# Altium PCB Zotino.PCBDOC (part 8 of 10)
Units mm, origin at the board's own origin, x right, y up, seen from the top; angles counter-clockwise.
Board outline 160.1 x 100.1 mm, 4 copper layers (TopLayer, Internal Plane 2, Signal Layer 1, BottomLayer), stack 1.563 mm thick; 759 components, 378 nets, 2272 pads, 779 vias.
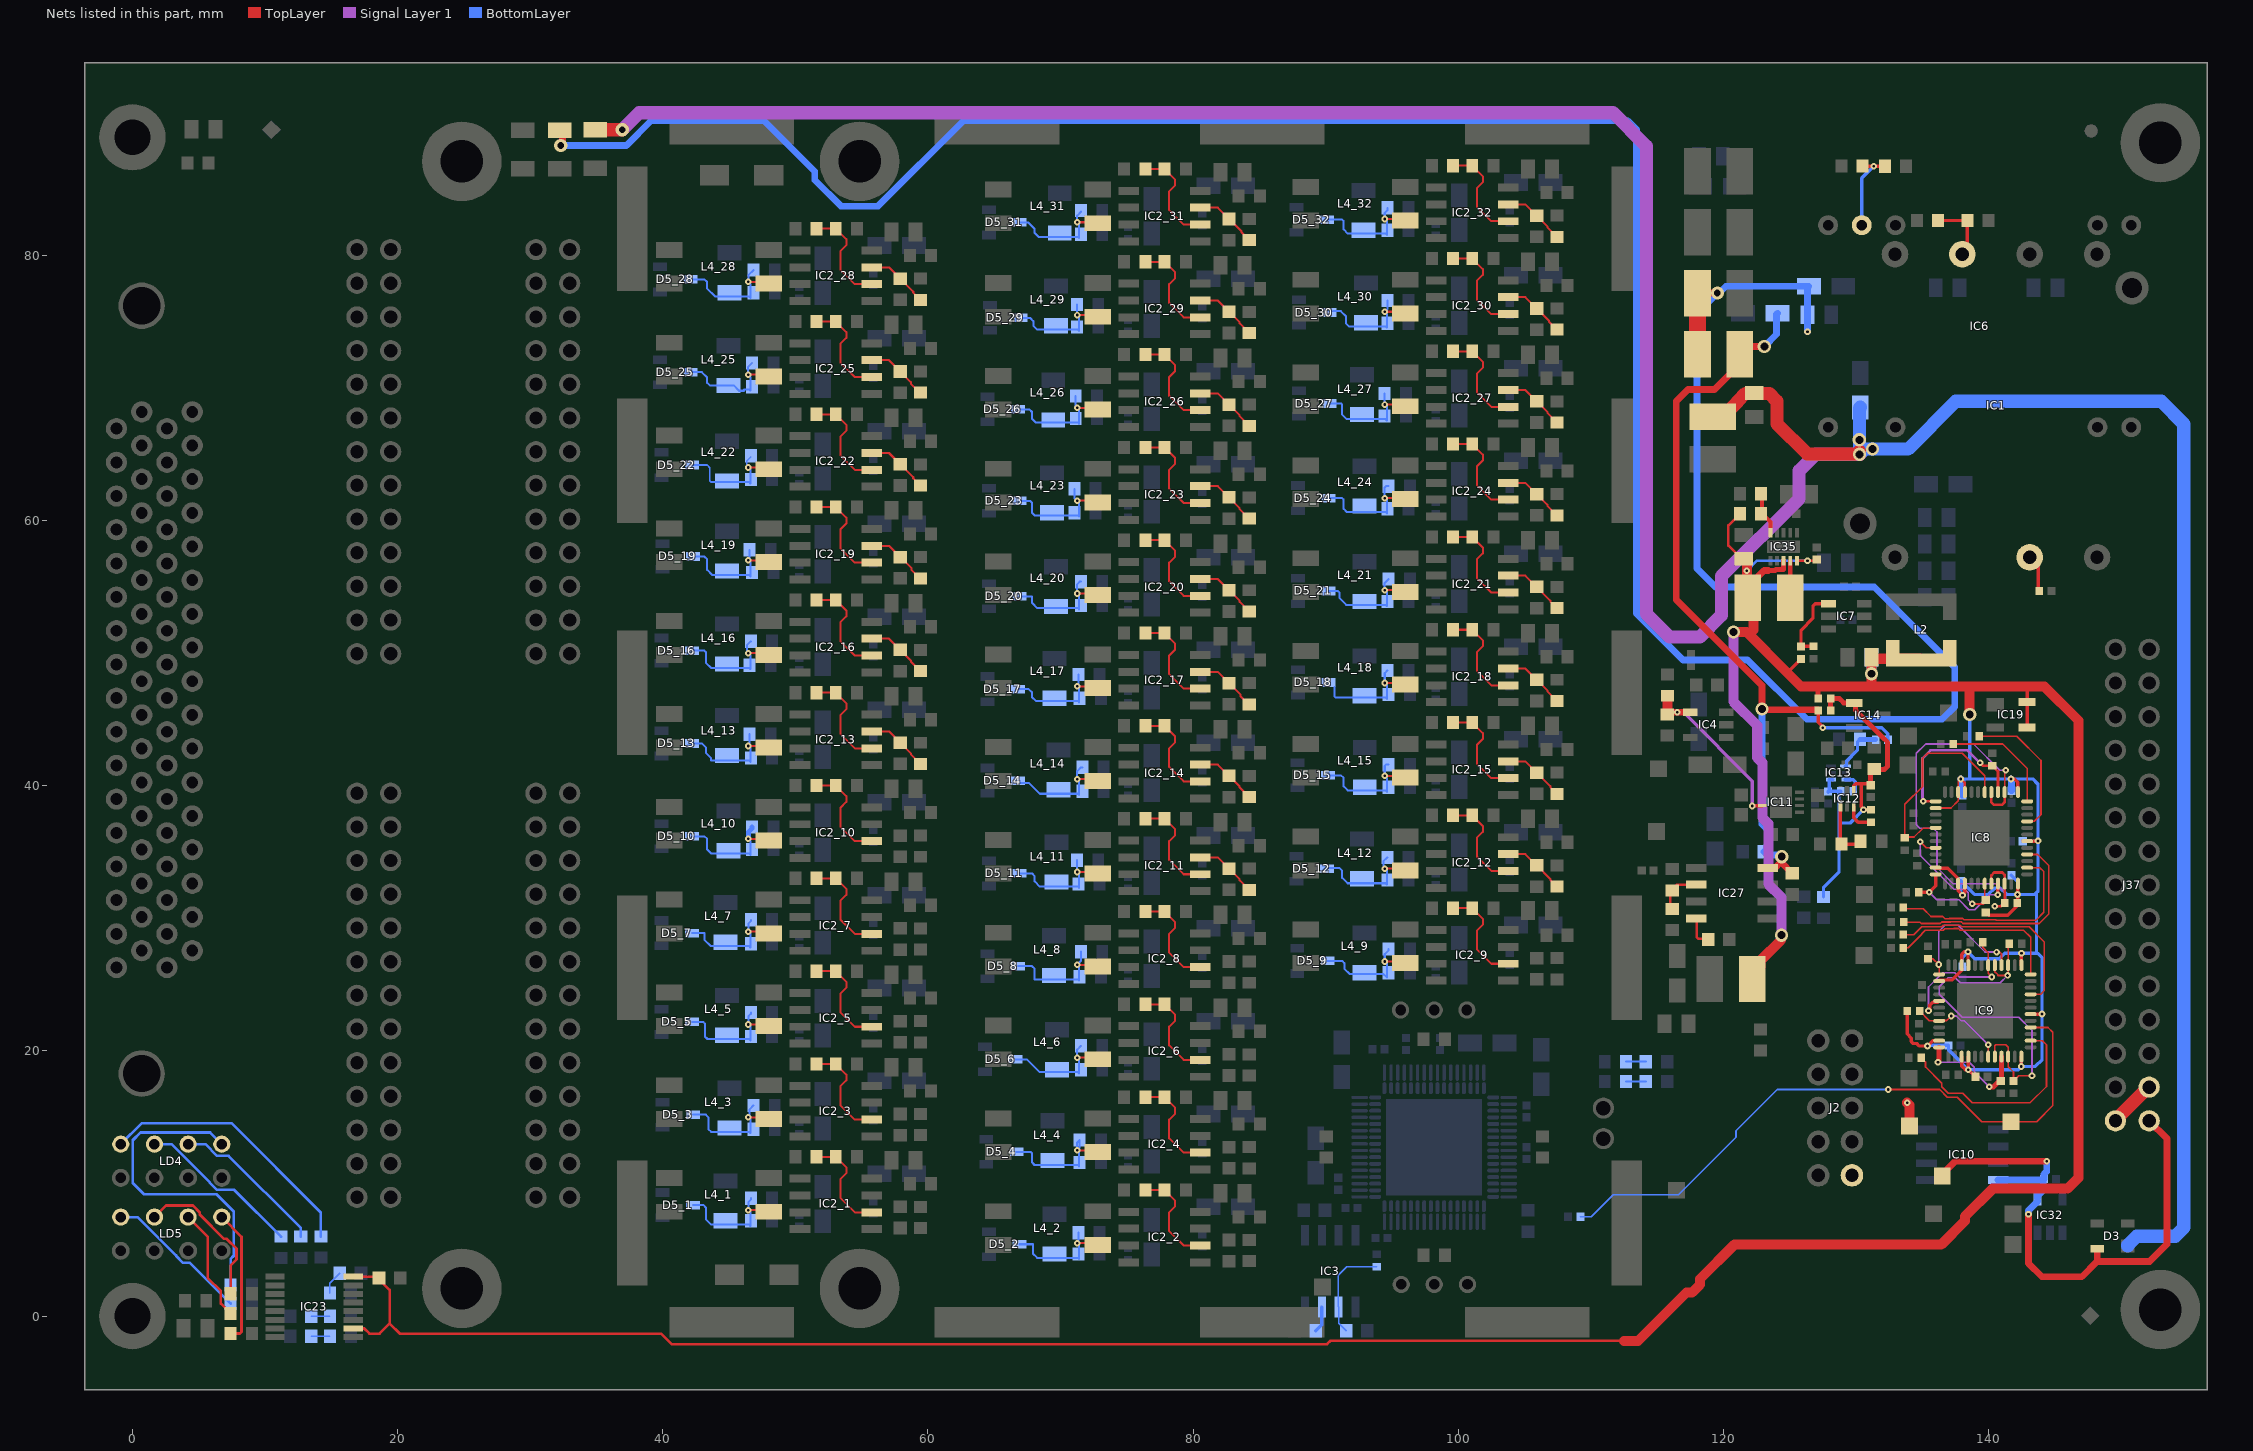
[diagram p8: the nets of this part, all layers, seen from the top]

## Via types
v1: diameter 0.5, hole 0.2, TopLayer to BottomLayer, tented both sides, 659 vias
v2: diameter 0.6, hole 0.3, TopLayer to BottomLayer, tented both sides, 56 vias
v3: diameter 1, hole 0.6, TopLayer to BottomLayer, tented both sides, 26 vias
v4: diameter 0.6, hole 0.3, TopLayer to BottomLayer, 18 vias
v5: diameter 1, hole 0.5, TopLayer to BottomLayer, tented both sides, 9 vias
v6: diameter 0.5, hole 0.2, TopLayer to BottomLayer, tented bottom, 7 vias
v7: diameter 0.5, hole 0.2, TopLayer to BottomLayer, 4 vias

## Nets (pads, with @x,y where several pads share a name; then routed paths per layer and width w, separated by ;. In a path a pad name is that pad's centre, name@x,y a point inside that pad or via, vN(x,y) a via of type N, cw(c..) or ccw(c..) an arc to the next point about the centre after c; other vN are vias at no path point) (continued)
NetC61_11_2: C61_11.2 IC2_11.3 R25_11.2 | length 4.7
  TopLayer w0.152: IC2_11.3@80.551,34.593 81.861,34.593 83.512,32.942 83.512,32.866 R25_11.2@84.236,32.142
NetC61_12_2: C61_12.2 IC2_12.3 R25_12.2 | length 4.7
  TopLayer w0.152: IC2_12.3@103.751,34.843 105.061,34.843 C61_12.2@105.912,33.992 106.94,32.964 106.94,32.888 R25_12.2@107.436,32.392
NetC61_13_2: C61_13.2 IC2_13.3 R25_13.2 | length 4.7
  TopLayer w0.152: IC2_13.3@55.751,44.093 57.061,44.093 C61_13.2@57.912,43.242 58.712,42.442 58.712,42.366 R25_13.2@59.436,41.642
NetC61_14_2: C61_14.2 IC2_14.3 R25_14.2 | length 4.7
  TopLayer w0.152: IC2_14.3@80.551,41.593 81.861,41.593 83.512,39.942 83.512,39.866 R25_14.2@84.236,39.142
NetC61_15_2: C61_15.2 IC2_15.3 R25_15.2 | length 4.7
  TopLayer w0.152: IC2_15.3@103.751,41.843 105.061,41.843 C61_15.2@105.912,40.992 106.94,39.964 106.94,39.888 R25_15.2@107.436,39.392
NetC61_16_2: C61_16.2 IC2_16.3 R25_16.2 | length 4.7
  TopLayer w0.152: IC2_16.3@55.751,51.093 57.061,51.093 C61_16.2@57.912,50.242 58.712,49.442 58.712,49.366 R25_16.2@59.436,48.642
NetC61_17_2: C61_17.2 IC2_17.3 R25_17.2 | length 4.8
  TopLayer w0.152: IC2_17.3@80.551,48.593 81.861,48.593 C61_17.2@82.712,47.742 83.566,46.888 83.566,46.766 84.19,46.142 R25_17.2@84.236,46.142
NetC61_18_2: C61_18.2 IC2_18.3 R25_18.2 | length 4.7
  TopLayer w0.152: IC2_18.3@103.751,48.843 105.061,48.843 106.712,47.192 106.712,47.116 R25_18.2@107.436,46.392
NetC61_19_2: C61_19.2 IC2_19.3 R25_19.2 | length 4.8
  TopLayer w0.152: IC2_19.3@55.751,58.093 57.061,58.093 58.766,56.388 58.766,56.266 59.39,55.642 R25_19.2@59.436,55.642
NetC61_20_2: C61_20.2 IC2_20.3 R25_20.2 | length 4.7
  TopLayer w0.152: IC2_20.3@80.551,55.593 81.861,55.593 83.512,53.942 83.512,53.866 R25_20.2@84.236,53.142
NetC61_21_2: C61_21.2 IC2_21.3 R25_21.2 | length 4.7
  TopLayer w0.152: IC2_21.3@103.751,55.843 105.061,55.843 106.94,53.964 106.94,53.888 R25_21.2@107.436,53.392
NetC61_22_2: C61_22.2 IC2_22.3 R25_22.2 | length 4.7
  TopLayer w0.152: IC2_22.3@55.751,65.093 57.061,65.093 C61_22.2@57.912,64.242 58.89,63.264 58.89,63.188 R25_22.2@59.436,62.642
NetC61_23_2: C61_23.2 IC2_23.3 R25_23.2 | length 4.7
  TopLayer w0.152: IC2_23.3@80.551,62.593 81.861,62.593 83.512,60.942 83.512,60.866 R25_23.2@84.236,60.142
NetC61_24_2: C61_24.2 IC2_24.3 R25_24.2 | length 4.8
  TopLayer w0.152: IC2_24.3@103.751,62.843 105.061,62.843 106.712,61.192 106.712,61.088 106.74,61.088 R25_24.2@107.436,60.392
NetC61_25_2: C61_25.2 IC2_25.3 R25_25.2 | length 4.8
  TopLayer w0.152: IC2_25.3@55.751,72.093 57.061,72.093 58.712,70.442 58.712,70.32 59.39,69.642 R25_25.2@59.436,69.642
NetC61_26_2: C61_26.2 IC2_26.3 R25_26.2 | length 4.7
  TopLayer w0.152: IC2_26.3@80.551,69.593 81.861,69.593 83.512,67.942 83.512,67.866 R25_26.2@84.236,67.142
NetC61_27_2: C61_27.2 IC2_27.3 R25_27.2 | length 4.7
  TopLayer w0.152: IC2_27.3@103.751,69.843 105.061,69.843 106.712,68.192 106.712,68.116 R25_27.2@107.436,67.392
NetC61_28_2: C61_28.2 IC2_28.3 R25_28.2 | length 4.7
  TopLayer w0.152: IC2_28.3@55.751,79.093 57.061,79.093 58.89,77.264 58.89,77.188 R25_28.2@59.436,76.642
NetC61_29_2: C61_29.2 IC2_29.3 R25_29.2 | length 4.7
  TopLayer w0.152: IC2_29.3@80.551,76.593 81.861,76.593 83.512,74.942 83.512,74.866 R25_29.2@84.236,74.142
NetC61_30_2: C61_30.2 IC2_30.3 R25_30.2 | length 4.7
  TopLayer w0.152: IC2_30.3@103.751,76.843 105.061,76.843 106.84,75.064 106.84,74.988 R25_30.2@107.436,74.392
NetC61_31_2: C61_31.2 IC2_31.3 R25_31.2 | length 4.7
  TopLayer w0.152: IC2_31.3@80.551,83.593 81.861,83.593 83.655,81.799 83.655,81.723 R25_31.2@84.236,81.142
NetC61_32_2: C61_32.2 IC2_32.3 R25_32.2 | length 4.8
  TopLayer w0.152: IC2_32.3@103.751,83.843 105.061,83.843 106.712,82.192 106.712,82.088 106.74,82.088 R25_32.2@107.436,81.392
NetC62_1_2: C62_1.2 D5_1.3 L4_1.1 R5_1.2 R7_1.2 | length 9.3
  TopLayer w0.152: v1(46.449,7.996) 47.863,7.996 L4_1.1@47.99,7.869
  BottomLayer w0.152: D5_1.3@42.294,8.369 42.308,8.383 43.049,8.383 43.244,8.188 43.244,7.305 43.655,6.894 46.507,6.894 46.607,6.794 46.607,7.839 v1(46.449,7.996) 46.449,8.594 46.644,8.788 R7_1.2@46.644,8.888
NetC62_2_2: C62_2.2 D5_2.3 L4_2.1 R5_2.2 R7_2.2 | length 9.1
  TopLayer w0.152: v1(71.249,5.496) 72.663,5.496 L4_2.1@72.79,5.369
  BottomLayer w0.152: D5_2.3@66.894,5.419 67.913,5.419 67.913,4.719 68.236,4.396 68.453,4.396 68.455,4.394 71.307,4.394 71.407,4.294 71.407,5.339 v1(71.249,5.496) 71.344,5.591 R7_2.2@71.344,6.288
NetC62_3_2: C62_3.2 D5_3.3 L4_3.1 R5_3.2 R7_3.2 | length 9.3
  TopLayer w0.152: v1(46.449,14.996) 47.863,14.996 L4_3.1@47.99,14.869
  BottomLayer w0.152: D5_3.3@42.294,15.188 43.244,15.188 43.444,14.988 43.444,14.105 43.655,13.894 46.507,13.894 46.607,13.794 46.607,14.839 v1(46.449,14.996) 46.544,15.091 46.544,15.588 R5_3.2@46.844,15.888
NetC62_4_2: C62_4.2 D5_4.3 L4_4.1 R5_4.2 R7_4.2 | length 10.2
  TopLayer w0.152: v1(71.249,12.496) 72.663,12.496 L4_4.1@72.79,12.369
  BottomLayer w0.152: D5_4.3@66.694,12.388 67.744,12.388 67.844,12.288 67.844,11.588 68.036,11.396 68.453,11.396 68.455,11.394 71.307,11.394 71.407,11.294 71.407,12.339 v1(71.249,12.496) ; v1(71.249,12.496) 71.249,13.094 R5_4.2@71.444,13.288 71.444,12.691 v1(71.249,12.496)
NetC62_5_2: C62_5.2 D5_5.3 L4_5.1 R5_5.2 R7_5.2 | length 9.4
  TopLayer w0.152: v1(46.449,21.996) 47.863,21.996 L4_5.1@47.99,21.869
  BottomLayer w0.152: D5_5.3@42.194,22.188 43.044,22.188 43.18,22.052 43.18,21.088 43.372,20.896 43.842,20.896 43.844,20.894 46.507,20.894 46.607,20.794 46.607,21.839 v1(46.449,21.996) 46.449,22.594 46.644,22.788 R5_5.2@46.644,22.888
NetC62_6_2: C62_6.2 D5_6.3 L4_6.1 R5_6.2 R7_6.2 | length 9.1
  TopLayer w0.152: v1(71.249,19.496) 72.663,19.496 L4_6.1@72.79,19.369
  BottomLayer w0.152: D5_6.3@66.61,19.369 67.463,19.369 68.438,18.394 71.307,18.394 71.407,18.294 71.407,19.339 v1(71.249,19.496) 71.244,19.501 71.244,20.088 R5_6.2@71.544,20.388
NetC62_7_2: C62_7.2 D5_7.3 L4_7.1 R5_7.2 R7_7.2 | length 9
  TopLayer w0.152: v1(46.449,28.996) 47.863,28.996 L4_7.1@47.99,28.869
  BottomLayer w0.152: D5_7.3@42.194,28.888 43.144,28.888 43.144,28.388 43.636,27.896 43.653,27.896 43.655,27.894 46.507,27.894 46.607,27.794 46.607,28.839 v1(46.449,28.996) 46.449,29.594 46.644,29.788 R5_7.2@46.644,29.888
NetC62_8_2: C62_8.2 D5_8.3 L4_8.1 R5_8.2 R7_8.2 | length 9.5
  TopLayer w0.152: v1(71.249,26.496) 72.663,26.496 L4_8.1@72.79,26.369
  BottomLayer w0.152: D5_8.3@66.799,26.388 67.844,26.388 68.044,26.188 68.044,25.396 68.453,25.396 68.455,25.394 71.307,25.394 71.407,25.294 71.407,26.339 v1(71.249,26.496) 71.544,26.791 R5_8.2@71.544,27.488
NetC62_9_2: C62_9.2 D5_9.3 L4_9.1 R5_9.2 R7_9.2 | length 9.2
  TopLayer w0.152: v1(94.449,26.746) 95.863,26.746 L4_9.1@95.99,26.619
  BottomLayer w0.152: D5_9.3@90.149,26.788 91.244,26.788 91.411,26.622 91.411,26.188 91.796,25.802 94.349,25.802 94.607,25.544 94.607,26.589 v1(94.449,26.746) 94.449,27.294 94.744,27.588 R5_9.2@94.744,27.69
NetC62_10_2: C62_10.2 D5_10.3 L4_10.1 R5_10.2 R7_10.2 | length 9.3
  TopLayer w0.152: v1(46.449,35.996) 47.863,35.996 L4_10.1@47.99,35.869
  BottomLayer w0.152: D5_10.3@42.194,36.188 43.144,36.188 43.344,35.988 43.344,35.188 43.636,34.896 43.653,34.896 43.655,34.894 46.507,34.894 46.607,34.794 46.607,35.839 v1(46.449,35.996)
  BottomLayer w0.381: v1(46.449,35.996) 46.449,36.494 46.744,36.788 R5_10.2@46.744,36.888
NetC62_11_2: C62_11.2 D5_11.3 L4_11.1 R5_11.2 R7_11.2 | length 9
  TopLayer w0.152: v1(71.249,33.496) 72.663,33.496 L4_11.1@72.79,33.369
  BottomLayer w0.152: D5_11.3@66.894,33.388 67.844,33.388 68.044,33.188 68.044,32.788 68.436,32.396 68.453,32.396 68.455,32.394 71.307,32.394 71.407,32.294 71.407,33.339 v1(71.249,33.496) 71.244,33.501 R5_11.2@71.244,34.388
NetC62_12_2: C62_12.2 D5_12.3 L4_12.1 R5_12.2 R7_12.2 | length 9.2
  TopLayer w0.152: v1(94.449,33.746) 95.863,33.746 L4_12.1@95.99,33.619
  BottomLayer w0.152: D5_12.3@90.149,33.788 91.044,33.788 91.244,33.588 91.244,33.055 91.655,32.644 94.507,32.644 94.607,32.544 94.607,33.589 v1(94.449,33.746) 94.344,33.851 94.344,34.288 R5_12.2@94.644,34.588
NetC62_13_2: C62_13.2 D5_13.3 L4_13.1 R5_13.2 R7_13.2 | length 9.1
  TopLayer w0.152: v1(46.449,42.996) 47.863,42.996 L4_13.1@47.99,42.869
  BottomLayer w0.152: D5_13.3@42.194,43.188 42.949,43.188 43.244,42.893 43.244,42.488 43.653,42.079 43.653,41.896 43.655,41.894 46.507,41.894 46.607,41.794 46.607,42.839 v1(46.449,42.996) 46.544,43.091 R5_13.2@46.544,43.888
NetC62_14_2: C62_14.2 D5_14.3 L4_14.1 R5_14.2 R7_14.2 | length 9
  TopLayer w0.152: v1(71.249,40.496) 72.663,40.496 L4_14.1@72.79,40.369
  BottomLayer w0.152: D5_14.3@66.799,40.388 66.993,40.194 67.638,40.194 68.438,39.394 71.307,39.394 71.407,39.294 71.407,40.339 v1(71.249,40.496) 71.249,41.094 71.544,41.388 R5_14.2@71.644,41.388
NetC62_15_2: C62_15.2 D5_15.3 L4_15.1 R5_15.2 R7_15.2 | length 9.3
  TopLayer w0.152: v1(94.449,40.746) 95.863,40.746 L4_15.1@95.99,40.619
  BottomLayer w0.152: D5_15.3@90.175,40.788 91.144,40.788 91.344,40.588 91.344,39.955 91.655,39.644 94.507,39.644 94.607,39.544 94.607,40.589 v1(94.449,40.746) 94.449,41.494 94.544,41.588 R5_15.2@94.744,41.588
NetC62_16_2: C62_16.2 D5_16.3 L4_16.1 R5_16.2 R7_16.2 | length 9.4
  TopLayer w0.152: v1(46.449,49.996) 47.863,49.996 L4_16.1@47.99,49.869
  BottomLayer w0.152: D5_16.3@42.194,50.188 43.144,50.188 43.244,50.088 43.244,49.288 43.636,48.896 43.742,48.896 43.744,48.894 46.507,48.894 46.607,48.794 46.607,49.839 v1(46.449,49.996) 46.344,50.101 46.344,50.588 R5_16.2@46.644,50.888
NetC62_17_2: C62_17.2 D5_17.3 L4_17.1 R5_17.2 R7_17.2 | length 9
  TopLayer w0.152: v1(71.249,47.496) 72.663,47.496 L4_17.1@72.79,47.369
  BottomLayer w0.152: D5_17.3@66.794,47.288 67.594,47.288 67.844,47.038 67.844,46.688 68.136,46.396 68.453,46.396 68.455,46.394 71.307,46.394 71.407,46.294 71.407,47.339 v1(71.249,47.496) 71.344,47.591 R5_17.2@71.344,48.388
NetC62_18_2: C62_18.2 D5_18.3 L4_18.1 R5_18.2 R7_18.2 | length 8.6
  TopLayer w0.152: v1(94.449,47.746) 95.863,47.746 L4_18.1@95.99,47.619
  BottomLayer w0.152: 90.657,47.444 90.657,46.738 90.749,46.646 91.653,46.646 91.655,46.644 94.507,46.644 94.607,46.544 94.607,47.589 v1(94.449,47.746) 94.449,48.494 R7_18.2@94.644,48.688
NetC62_19_2: C62_19.2 D5_19.3 L4_19.1 R5_19.2 R7_19.2 | length 9.1
  TopLayer w0.152: v1(46.449,56.996) 47.863,56.996 L4_19.1@47.99,56.869
  BottomLayer w0.152: D5_19.3@42.294,57.288 43.144,57.288 43.35,57.082 43.35,56.288 43.744,55.894 46.507,55.894 46.607,55.794 46.607,56.839 v1(46.449,56.996) 46.544,57.091 R7_19.2@46.544,57.788
NetC62_20_2: C62_20.2 D5_20.3 L4_20.1 R5_20.2 R7_20.2 | length 9.1
  TopLayer w0.152: v1(71.249,54.496) 72.663,54.496 L4_20.1@72.79,54.369
  BottomLayer w0.152: D5_20.3@66.894,54.288 67.844,54.288 67.844,53.788 68.236,53.396 68.453,53.396 68.455,53.394 71.307,53.394 71.407,53.294 71.407,54.339 v1(71.249,54.496) 71.249,55.194 71.444,55.388 R5_20.2@71.544,55.388
NetC62_21_2: C62_21.2 D5_21.3 L4_21.1 R5_21.2 R7_21.2 | length 8.9
  TopLayer w0.152: v1(94.449,54.746) 95.863,54.746 L4_21.1@95.99,54.619
  BottomLayer w0.152: D5_21.3@90.194,54.688 90.894,54.688 91.044,54.538 91.044,54.146 91.544,53.646 91.653,53.646 91.655,53.644 94.507,53.644 94.607,53.544 94.607,54.589 v1(94.449,54.746) 94.444,54.751 94.444,55.288 R5_21.2@94.744,55.588
NetC62_22_2: C62_22.2 D5_22.3 L4_22.1 R5_22.2 R7_22.2 | length 9.4
  TopLayer w0.152: v1(46.449,63.996) 47.863,63.996 L4_22.1@47.99,63.869
  BottomLayer w0.127: D5_22.3@42.194,64.188 43.344,64.188 43.544,63.988 43.544,63.005 43.653,62.896 ; v1(46.449,63.996) 46.344,64.101 46.344,64.488 R5_22.2@46.644,64.788
  BottomLayer w0.152: 43.653,62.896 43.655,62.894 46.507,62.894 46.607,62.794 46.607,63.839 v1(46.449,63.996)
NetC62_23_2: C62_23.2 D5_23.3 L4_23.1 R5_23.2 R7_23.2 | length 9.3
  TopLayer w0.152: v1(71.249,61.496) 72.663,61.496 L4_23.1@72.79,61.369
  BottomLayer w0.152: D5_23.3@66.894,61.488 67.694,61.488 67.844,61.338 67.844,60.588 68.036,60.396 68.453,60.396 68.455,60.394 71.307,60.394 71.407,60.294 71.407,61.339 v1(71.249,61.496) 71.044,61.701 R5_23.2@71.044,62.388
NetC62_24_2: C62_24.2 D5_24.3 L4_24.1 R5_24.2 R7_24.2 | length 9.3
  TopLayer w0.152: v1(94.444,61.688) 95.805,61.688 95.863,61.746 L4_24.1@95.99,61.619
  BottomLayer w0.152: D5_24.3@90.194,61.688 91.244,61.688 91.344,61.588 91.344,60.888 91.588,60.644 94.507,60.644 94.607,60.544 94.607,61.589 94.507,61.688 v1(94.444,61.688) 94.444,62.488 94.544,62.588 R5_24.2@94.744,62.588
NetC62_25_2: C62_25.2 D5_25.3 L4_25.1 R5_25.2 R7_25.2 | length 9.2
  TopLayer w0.152: v1(46.449,70.996) 47.863,70.996 L4_25.1@47.99,70.869
  BottomLayer w0.152: D5_25.3@42.094,71.188 42.944,71.188 43.344,70.788 43.344,70.388 43.544,70.188 C62_25.2@44.944,70.188 45.35,70.188 45.75,69.788 46.144,69.788 ; 46.144,69.894 46.507,69.894 46.607,69.794 46.607,70.839 v1(46.449,70.996) 46.444,71.001 46.444,71.588 R5_25.2@46.744,71.888
NetC62_26_2: C62_26.2 D5_26.3 L4_26.1 R5_26.2 R7_26.2 | length 9.2
  TopLayer w0.152: v1(71.249,68.496) 72.663,68.496 L4_26.1@72.79,68.369
  BottomLayer w0.152: D5_26.3@66.794,68.388 67.644,68.388 67.844,68.188 67.844,67.688 68.136,67.396 68.453,67.396 68.455,67.394 71.307,67.394 71.407,67.294 71.407,68.339 v1(71.249,68.496) 71.144,68.601 R5_26.2@71.144,69.388
NetC62_27_2: C62_27.2 D5_27.3 L4_27.1 R5_27.2 R7_27.2 | length 9
  TopLayer w0.152: v1(94.449,68.746) 95.863,68.746 L4_27.1@95.99,68.619
  BottomLayer w0.152: D5_27.3@90.294,68.824 91.158,68.824 91.244,68.738 91.244,67.988 91.586,67.646 91.653,67.646 91.655,67.644 94.507,67.644 94.607,67.544 94.607,68.589 v1(94.449,68.746) 94.444,68.751 R5_27.2@94.444,69.588
NetC62_28_2: C62_28.2 D5_28.3 L4_28.1 R5_28.2 R7_28.2 | length 9.3
  TopLayer w0.152: v1(46.449,77.996) 47.863,77.996 L4_28.1@47.99,77.869
  BottomLayer w0.152: D5_28.3@42.094,78.188 43.144,78.188 43.344,77.988 43.344,77.494 43.944,76.894 46.507,76.894 46.607,76.794 46.607,77.839 v1(46.449,77.996) 46.449,78.494 R5_28.2@46.844,78.888
NetC62_29_2: C62_29.2 D5_29.3 L4_29.1 R5_29.2 R7_29.2 | length 8.7
  TopLayer w0.152: v1(71.249,75.496) 72.663,75.496 L4_29.1@72.79,75.369
  BottomLayer w0.152: D5_29.3@66.994,75.288 67.694,75.288 67.944,75.038 67.944,74.688 68.236,74.396 68.453,74.396 68.455,74.394 71.307,74.394 71.407,74.294 71.407,75.339 v1(71.249,75.496) 71.244,75.501 R5_29.2@71.244,76.288
NetC62_30_2: C62_30.2 D5_30.3 L4_30.1 R5_30.2 R7_30.2 | length 8.9
  TopLayer w0.152: v1(94.449,75.746) 95.863,75.746 L4_30.1@95.99,75.619
  BottomLayer w0.152: D5_30.3@90.294,75.788 91.144,75.788 91.544,75.388 91.544,74.844 91.744,74.644 94.507,74.644 94.607,74.544 94.607,75.589 v1(94.449,75.746) 94.644,75.941 R5_30.2@94.644,76.588
NetC62_31_2: C62_31.2 D5_31.3 L4_31.1 R5_31.2 R7_31.2 | length 9
  TopLayer w0.152: v1(71.249,82.496) 72.663,82.496 L4_31.1@72.79,82.369
  BottomLayer w0.152: D5_31.3@66.899,82.488 67.544,82.488 68.044,81.988 68.044,81.688 68.336,81.396 68.453,81.396 68.455,81.394 71.307,81.394 71.407,81.294 71.407,82.339 v1(71.249,82.496) 71.249,82.994 R5_31.2@71.544,83.288
NetC62_32_2: C62_32.2 D5_32.3 L4_32.1 R5_32.2 R7_32.2 | length 9.1
  TopLayer w0.152: v1(94.449,82.746) 95.863,82.746 L4_32.1@95.99,82.619
  BottomLayer w0.152: D5_32.3@90.094,82.688 91.244,82.688 91.344,82.588 91.344,81.955 91.655,81.644 94.507,81.644 94.607,81.544 94.607,82.589 v1(94.449,82.746) 94.449,83.194 94.644,83.388 R5_32.2@94.644,83.588
NetC63_2: C63.2 C133.2 C134.1 IC27.8 L7.2 R36.2 R38.2 | length 64.7
  TopLayer w0.254: R36.2@127.138,45.676 127.138,44.789 127.478,44.449 v1(127.478,44.382)
  TopLayer w0.508: v3(123.08,73.134) 121.237,73.134 121.237,71.8 120.491,71.054 120.484,71.054 119.318,69.888 117.325,69.888 116.43,68.993 116.43,54.048 122.907,47.571 v3(122.907,45.793) 122.968,45.732 127.102,45.732 127.138,45.696 R36.2@127.138,45.676 ; IC27.8@123.34,33.81 123.889,33.81 v3@124.278,34.199 ; v3(124.39,34.653) 124.296,34.559 124.296,34.217 v3@124.278,34.199 ; C133.2@125.178,33.399 124.378,34.199 v3@124.278,34.199
  BottomLayer w0.254: v1(127.478,44.382) 127.487,44.374 131.939,44.374 132.393,43.919 132.393,43.491 R38.2@132.409,43.475
  BottomLayer w0.508: v3(122.907,45.793) 122.907,38.761 122.911,38.757 122.911,38.235 122.907,38.231 122.907,37.104 123.369,36.642 123.369,35.562 123.273,35.466 123.273,35.239 C63.2@123.052,35.018 123.273,34.797 123.273,34.772 124.138,34.772 124.257,34.653 v3(124.39,34.653) ; v3(123.08,73.134) 123.994,74.048 123.994,75.553 C134.1@124.08,75.638
NetC64_1: C64.1 IC27.4 | length 2.3
  TopLayer w0.2: IC27.4@117.94,30 117.973,29.968 117.973,28.588 118.09,28.471 C64.1@118.776,28.471
NetC68_2: C68.2 R117.1 | length 1.5
  BottomLayer w0.152: R117.1@112.644,19.191 C68.2@114.144,19.191
NetC71_2: C71.2 R118.1 | length 1.4
  BottomLayer w0.127: C71.2@13.494,-0.012 R118.1@14.894,-0.012
NetC76_2: C76.2 R82.1 | length 1.4
  BottomLayer w0.127: C76.2@13.494,-1.512 R82.1@14.894,-1.512
NetC77_2: C77.2 R58.1 | length 1.8
  BottomLayer w0.127: R58.1@14.894,1.738 14.894,2.488 C77.2@15.644,3.238
NetC80_2: C80.2 IC3.2 R3.2 | length 7.6
  BottomLayer w0.127: C80.2@91.544,-1.112 90.979,-0.547 IC3.2@90.979,0.688 90.944,0.723 90.944,3.088 91.574,3.718 R3.2@93.844,3.718
NetC82_2: C82.2 IC3.3 | length 2
  BottomLayer w0.254: C82.2@89.244,-1.112 89.69,-0.666 89.69,0.669 IC3.3@89.709,0.688
NetC95_2: C95.2 R116.1 | length 1.5
  BottomLayer w0.152: R116.1@112.644,17.688 C95.2@114.144,17.688
NetC131_2: C131.2 C132.1 L6.2 L7.1 R31.1 | length 216.4
  TopLayer w0.508: v5(32.311,88.284) 32.311,88.549 32.444,88.682 R31.1@32.444,89.438 ; L6.2@118.037,77.147 118.055,77.165 v5(119.537,77.165)
  TopLayer w1.27: L7.1@118.037,73.134 L6.2@118.037,77.147
  BottomLayer w0.508: v5(32.311,88.284) 37.25,88.284 39.116,90.15 47.647,90.15 51.463,86.334 51.463,85.688 53.444,83.707 56.244,83.707 62.688,90.15 112.782,90.15 113.444,89.488 113.444,52.988 116.944,49.488 121.815,49.488 126.29,45.013 136.484,45.013 137.444,45.973 137.444,48.915 131.367,54.992 119.401,54.992 118.004,56.389 118.004,75.632 v5(119.537,77.165) ; v5@119.46,77.165 119.67,77.165 120.176,77.67 C132.1@126.433,77.67 126.325,77.562 C131.2@126.325,75.511 126.324,74.252 v1(126.336,74.241)
NetIC1_2: IC1.2 R2.2 | length 2.8
  TopLayer w0.254: IC1.2@143.092,57.226 143.726,56.592 R2.2@143.726,54.686
NetIC1_6: IC1.6 R1.1 R4.2 | length 4.9
  TopLayer w0.254: R1.1@136.182,82.626 R4.2@138.392,82.626 138.392,80.466 IC1.6@138.012,80.086
NetIC2_1_2: IC2_1.2 R67_1.1 R68_1.2 | length 7.9
  TopLayer w0.152: R67_1.1@51.6,12.014 R68_1.2@53.048,12.014 53.848,11.214 53.848,10.776 53.395,10.323 53.395,8.911 54.483,7.823 IC2_1.2@55.751,7.823
NetIC2_2_2: IC2_2.2 R67_2.1 R68_2.2 | length 7.9
  TopLayer w0.152: R67_2.1@76.4,9.514 R68_2.2@77.848,9.514 78.648,8.714 78.648,8.276 78.195,7.823 78.195,6.411 79.283,5.323 IC2_2.2@80.551,5.323
NetIC2_3_2: IC2_3.2 R67_3.1 R68_3.2 | length 7.9
  TopLayer w0.152: R67_3.1@51.6,19.014 R68_3.2@53.048,19.014 53.848,18.214 53.848,17.776 53.395,17.323 53.395,15.911 54.483,14.823 IC2_3.2@55.751,14.823
NetIC2_4_2: IC2_4.2 R67_4.1 R68_4.2 | length 7.9
  TopLayer w0.152: R67_4.1@76.4,16.514 R68_4.2@77.848,16.514 78.648,15.714 78.648,15.276 78.195,14.823 78.195,13.411 79.283,12.323 IC2_4.2@80.551,12.323
NetIC2_5_2: IC2_5.2 R67_5.1 R68_5.2 | length 7.9
  TopLayer w0.152: R67_5.1@51.6,26.014 R68_5.2@53.048,26.014 53.848,25.214 53.848,24.776 53.395,24.323 53.395,22.911 54.483,21.823 IC2_5.2@55.751,21.823
NetIC2_6_2: IC2_6.2 R67_6.1 R68_6.2 | length 7.9
  TopLayer w0.152: R67_6.1@76.4,23.514 R68_6.2@77.848,23.514 78.648,22.714 78.648,22.276 78.195,21.823 78.195,20.411 79.283,19.323 IC2_6.2@80.551,19.323
NetIC2_7_2: IC2_7.2 R67_7.1 R68_7.2 | length 7.9
  TopLayer w0.152: R67_7.1@51.6,33.014 R68_7.2@53.048,33.014 53.848,32.214 53.848,31.776 53.395,31.323 53.395,29.911 54.483,28.823 IC2_7.2@55.751,28.823
NetIC2_8_2: IC2_8.2 R67_8.1 R68_8.2 | length 7.9
  TopLayer w0.152: R67_8.1@76.4,30.514 R68_8.2@77.848,30.514 78.648,29.714 78.648,29.276 78.195,28.823 78.195,27.411 79.283,26.323 IC2_8.2@80.551,26.323
NetIC2_9_2: IC2_9.2 R67_9.1 R68_9.2 | length 7.9
  TopLayer w0.152: R67_9.1@99.6,30.764 R68_9.2@101.048,30.764 101.848,29.964 101.848,29.526 101.395,29.073 101.395,27.661 102.483,26.573 IC2_9.2@103.751,26.573
NetIC2_10_2: IC2_10.2 R67_10.1 R68_10.2 | length 7.9
  TopLayer w0.152: R67_10.1@51.6,40.014 R68_10.2@53.048,40.014 53.848,39.214 53.848,38.776 53.395,38.323 53.395,36.911 54.483,35.823 IC2_10.2@55.751,35.823
NetIC2_11_2: IC2_11.2 R67_11.1 R68_11.2 | length 7.9
  TopLayer w0.152: R67_11.1@76.4,37.514 R68_11.2@77.848,37.514 78.648,36.714 78.648,36.276 78.195,35.823 78.195,34.411 79.283,33.323 IC2_11.2@80.551,33.323
NetIC2_12_2: IC2_12.2 R67_12.1 R68_12.2 | length 7.9
  TopLayer w0.152: R67_12.1@99.6,37.764 R68_12.2@101.048,37.764 101.848,36.964 101.848,36.526 101.395,36.073 101.395,34.661 102.483,33.573 IC2_12.2@103.751,33.573
NetIC2_13_2: IC2_13.2 R67_13.1 R68_13.2 | length 7.9
  TopLayer w0.152: R67_13.1@51.6,47.014 R68_13.2@53.048,47.014 53.848,46.214 53.848,45.776 53.395,45.323 53.395,43.911 54.483,42.823 IC2_13.2@55.751,42.823
NetIC2_14_2: IC2_14.2 R67_14.1 R68_14.2 | length 7.9
  TopLayer w0.152: R67_14.1@76.4,44.514 R68_14.2@77.848,44.514 78.648,43.714 78.648,43.276 78.195,42.823 78.195,41.411 79.283,40.323 IC2_14.2@80.551,40.323
NetIC2_15_2: IC2_15.2 R67_15.1 R68_15.2 | length 7.9
  TopLayer w0.152: R67_15.1@99.6,44.764 R68_15.2@101.048,44.764 101.848,43.964 101.848,43.526 101.395,43.073 101.395,41.661 102.483,40.573 IC2_15.2@103.751,40.573
NetIC2_16_2: IC2_16.2 R67_16.1 R68_16.2 | length 7.9
  TopLayer w0.152: R67_16.1@51.6,54.014 R68_16.2@53.048,54.014 53.848,53.214 53.848,52.776 53.395,52.323 53.395,50.911 54.483,49.823 IC2_16.2@55.751,49.823
NetIC2_17_2: IC2_17.2 R67_17.1 R68_17.2 | length 7.9
  TopLayer w0.152: R67_17.1@76.4,51.514 R68_17.2@77.848,51.514 78.648,50.714 78.648,50.276 78.195,49.823 78.195,48.411 79.283,47.323 IC2_17.2@80.551,47.323
NetIC2_18_2: IC2_18.2 R67_18.1 R68_18.2 | length 7.9
  TopLayer w0.152: R67_18.1@99.6,51.764 R68_18.2@101.048,51.764 101.848,50.964 101.848,50.526 101.395,50.073 101.395,48.661 102.483,47.573 IC2_18.2@103.751,47.573
NetIC2_19_2: IC2_19.2 R67_19.1 R68_19.2 | length 7.9
  TopLayer w0.152: R67_19.1@51.6,61.014 R68_19.2@53.048,61.014 53.848,60.214 53.848,59.776 53.395,59.323 53.395,57.911 54.483,56.823 IC2_19.2@55.751,56.823
NetIC2_20_2: IC2_20.2 R67_20.1 R68_20.2 | length 7.9
  TopLayer w0.152: R67_20.1@76.4,58.514 R68_20.2@77.848,58.514 78.648,57.714 78.648,57.276 78.195,56.823 78.195,55.411 79.283,54.323 IC2_20.2@80.551,54.323
NetIC2_21_2: IC2_21.2 R67_21.1 R68_21.2 | length 7.9
  TopLayer w0.152: R67_21.1@99.6,58.764 R68_21.2@101.048,58.764 101.848,57.964 101.848,57.526 101.395,57.073 101.395,55.661 102.483,54.573 IC2_21.2@103.751,54.573
NetIC2_22_2: IC2_22.2 R67_22.1 R68_22.2 | length 7.9
  TopLayer w0.152: R67_22.1@51.6,68.014 R68_22.2@53.048,68.014 53.848,67.214 53.848,66.776 53.395,66.323 53.395,64.911 54.483,63.823 IC2_22.2@55.751,63.823
NetIC2_23_2: IC2_23.2 R67_23.1 R68_23.2 | length 7.9
  TopLayer w0.152: R67_23.1@76.4,65.514 R68_23.2@77.848,65.514 78.648,64.714 78.648,64.276 78.195,63.823 78.195,62.411 79.283,61.323 IC2_23.2@80.551,61.323
NetIC2_24_2: IC2_24.2 R67_24.1 R68_24.2 | length 7.9
  TopLayer w0.152: R67_24.1@99.6,65.764 R68_24.2@101.048,65.764 101.848,64.964 101.848,64.526 101.395,64.073 101.395,62.661 102.483,61.573 IC2_24.2@103.751,61.573
NetIC2_25_2: IC2_25.2 R67_25.1 R68_25.2 | length 7.9
  TopLayer w0.152: R67_25.1@51.6,75.014 R68_25.2@53.048,75.014 53.848,74.214 53.848,73.776 53.395,73.323 53.395,71.911 54.483,70.823 IC2_25.2@55.751,70.823
NetIC2_26_2: IC2_26.2 R67_26.1 R68_26.2 | length 7.9
  TopLayer w0.152: R67_26.1@76.4,72.514 R68_26.2@77.848,72.514 78.648,71.714 78.648,71.276 78.195,70.823 78.195,69.411 79.283,68.323 IC2_26.2@80.551,68.323
NetIC2_27_2: IC2_27.2 R67_27.1 R68_27.2 | length 7.9
  TopLayer w0.152: R67_27.1@99.6,72.764 R68_27.2@101.048,72.764 101.848,71.964 101.848,71.526 101.395,71.073 101.395,69.661 102.483,68.573 IC2_27.2@103.751,68.573
NetIC2_28_2: IC2_28.2 R67_28.1 R68_28.2 | length 7.9
  TopLayer w0.152: R67_28.1@51.6,82.014 R68_28.2@53.048,82.014 53.848,81.214 53.848,80.776 53.395,80.323 53.395,78.911 54.483,77.823 IC2_28.2@55.751,77.823
NetIC2_29_2: IC2_29.2 R67_29.1 R68_29.2 | length 7.9
  TopLayer w0.152: R67_29.1@76.4,79.514 R68_29.2@77.848,79.514 78.648,78.714 78.648,78.276 78.195,77.823 78.195,76.411 79.283,75.323 IC2_29.2@80.551,75.323
NetIC2_30_2: IC2_30.2 R67_30.1 R68_30.2 | length 7.9
  TopLayer w0.152: R67_30.1@99.6,79.764 R68_30.2@101.048,79.764 101.848,78.964 101.848,78.526 101.395,78.073 101.395,76.661 102.483,75.573 IC2_30.2@103.751,75.573
NetIC2_31_2: IC2_31.2 R67_31.1 R68_31.2 | length 7.9
  TopLayer w0.152: R67_31.1@76.4,86.514 R68_31.2@77.848,86.514 78.648,85.714 78.648,85.276 78.195,84.823 78.195,83.411 79.283,82.323 IC2_31.2@80.551,82.323
NetIC2_32_2: IC2_32.2 R67_32.1 R68_32.2 | length 7.9
  TopLayer w0.152: R67_32.1@99.6,86.764 R68_32.2@101.048,86.764 101.848,85.964 101.848,85.526 101.395,85.073 101.395,83.661 102.483,82.573 IC2_32.2@103.751,82.573
NetIC4_4: IC4.4 IC11.3 R69.1 R70.2 | length 13.1
  TopLayer w0.254: v1(122.169,38.47) 122.202,38.503 122.932,38.503 IC11.3@122.934,38.505
  TopLayer w0.508: R69.1@116.176,45.539 v1(116.504,45.539) IC4.4@117.446,45.539
  TopLayer w0.762: R69.1@115.766,45.396 R70.2@115.766,46.788
  Signal Layer 1 w0.254: v1(116.504,45.539) 116.551,45.492 117.032,45.492 122.173,40.351 122.173,38.474 v1(122.169,38.47)
NetIC6_10: IC6.10 R26.1 R27.2 | length 6.5
  TopLayer w0.254: R27.2@130.487,86.732 v1(131.325,86.732) 132.164,86.732 R26.1@132.176,86.719
  BottomLayer w0.254: IC6.10@130.427,82.277 130.427,85.834 v1(131.325,86.732)
NetIC7_4: IC7.4 R33.1 R34.2 | length 5.6
  TopLayer w0.254: R34.2@126.794,50.511 126.789,50.505 125.85,50.505 R33.1@125.844,50.5 125.844,51.738 126.744,52.638 126.744,53.549 126.918,53.723 IC7.4@127.92,53.723
NetIC8_1: IC8.1 IC8.40 R16.2 | length 12.4
  TopLayer w0.203: v1(135.075,38.819) IC8.1@136,38.819 ; v1(139.348,41.729) 139.567,41.511 R16.2@140.271,41.511 140.7,41.082 IC8.40@140.7,39.519
  Signal Layer 1 w0.203: v1(135.075,38.819) 135.008,38.886 135.008,42.069 135.608,42.669 138.408,42.669 v1(139.348,41.729)
NetIC8_5: IC8.5 IC8.42 R17.2 | length 15.9
  TopLayer w0.127: IC8.5@136,36.819 135.983,36.802 135.039,36.802 134.367,36.13 133.673,36.13 133.673,38.592 135.008,39.927 135.008,42.069 135.389,42.451 137.992,42.451 139.7,40.743 IC8.42@139.7,39.519
NetIC8_8: IC8.8 IC8.19 R18.2 | length 10.6
  TopLayer w0.127: v1(134.827,35.786) 135.294,35.319 IC8.8@136,35.319 ; v1(138.764,31.087) 139.625,31.087 139.7,31.161 IC8.19@139.7,32.619
  Signal Layer 1 w0.127: v1(134.827,35.786) 134.827,34.741 137.38,32.188 138.21,32.188 138.468,31.93 138.468,31.383 v1(138.764,31.087)
NetIC8_12: IC8.12 IC8.21 R19.2 | length 9.4
  TopLayer w0.254: R19.2@134.721,31.973 v1(135.51,31.973) 136,32.463 IC8.12@136,33.319 ; v1(140.669,31.773) 140.669,32.537 140.644,32.562 IC8.21@140.7,32.619
  Signal Layer 1 w0.127: v1(135.51,31.973) 136.092,31.392 137.76,31.392 138.505,30.646 138.946,30.646 140.073,31.773 v1(140.669,31.773)
  Signal Layer 1 w0.254: v1@140.669,31.729 v1(140.669,31.773)
NetIC8_20: IC8.20 IC8.22 IC8.39 IC8.41 R6.1 | length 34.4
  TopLayer w0.127: IC8.39@141.2,39.519 141.2,41.168 141.202,41.171 v1(141.279,41.171)
  TopLayer w0.203: IC8.20@140.2,32.619 140.2,33.234 140.415,33.449 141.025,33.449 141.2,33.274 IC8.22@141.2,32.619 141.2,31.178 140.931,30.909 v1(140.466,30.909) ; IC8.41@140.2,39.519 140.2,38.744 140.39,38.554 140.999,38.554 141.2,38.755 IC8.39@141.2,39.519
  Signal Layer 1 w0.127: v1(140.466,30.909) 140.847,30.909 141.279,31.341 141.279,31.876 140.536,32.619 137.308,32.619 136.097,33.83 136.097,36.512 135.807,36.802 134.79,36.802 134.532,37.06 134.532,42.444 135.24,43.152 138.853,43.152 140.834,41.171 v1(141.279,41.171)
NetIC8_26: IC8.26 R97.2 | length 15.6
  TopLayer w0.127: R97.2@133.57,30.731 135.056,30.731 135.645,30.141 136.541,30.141 136.704,29.978 137.033,29.978 137.046,29.991 138.042,29.991 138.14,29.893 140.543,29.893 140.571,29.865 143.562,29.865 144.149,30.452 144.149,33.525 143.855,33.819 IC8.26@142.9,33.819
NetIC8_28: IC8.28 R14.2 | length 17
  TopLayer w0.127: R14.2@133.595,29.715 134.802,29.715 134.903,29.614 136.356,29.614 136.466,29.724 137.138,29.724 137.151,29.737 137.937,29.737 138.06,29.614 140.463,29.614 140.466,29.611 143.816,29.611 144.53,30.325 144.53,33.982 143.694,34.819 IC8.28@142.9,34.819
NetIC8_33: IC8.33 R13.2 | length 10.8
  TopLayer w0.127: R13.2@139.293,43.738 142.115,43.738 143.946,41.907 143.946,37.818 143.446,37.319 IC8.33@142.9,37.319
NetIC8_36: IC8.36 R11.2 | length 8.8
  TopLayer w0.127: R11.2@137.329,43.152 141.05,43.152 142.9,41.302 IC8.36@142.9,38.819
NetIC9_1: IC9.1 IC9.40 R20.2 | length 10.8
  TopLayer w0.127: R20.2@135.411,26.959 135.787,26.959 v1(136.224,26.522) 136.264,26.482 IC9.1@136.264,25.772 ; v1@140.713,27.575 140.964,27.325 IC9.40@140.964,26.472
  Signal Layer 1 w0.127: v1(136.224,26.522) 136.224,29.003 136.691,29.47 137.708,29.47 137.783,29.395 139.723,27.455 v1(140.593,27.455)
NetIC9_5: IC9.5 IC9.42 R21.2 | length 11.3
  TopLayer w0.127: R21.2@139.539,28.191 139.539,27.81 139.964,27.385 IC9.42@139.964,26.472 139.964,25.848 v1(140.237,25.575)
  TopLayer w0.254: v1(135.456,23.035) 135.56,23.139 135.56,23.439 135.797,23.676 136.168,23.676 IC9.5@136.264,23.772
  Signal Layer 1 w0.127: v1(135.456,23.035) 135.456,24.823 136.538,25.905 137.444,25.905 137.774,25.575 v1(140.237,25.575)
NetIC9_8: IC9.8 IC9.19 R22.2 | length 7.4
  TopLayer w0.127: R22.2@134.789,23.01 135.527,22.272 IC9.8@136.264,22.272 136.281,22.289 136.824,22.289 v1(137.164,22.629) ; v1(139.958,20.47) 139.958,19.578 IC9.19@139.964,19.572
  Signal Layer 1 w0.127: v1(137.164,22.629) 137.554,22.629 137.906,22.277 138.152,22.277 139.958,20.472 v1(139.958,20.47)
NetIC9_12: IC9.12 IC9.21 R23.2 | length 8.9
  TopLayer w0.381: v1(136.173,19.149) 136.264,19.24 IC9.12@136.264,20.272 ; v1(140.034,17.295) 140.354,17.295 140.797,17.737 R23.2@140.906,17.737 140.964,17.795 IC9.21@140.964,19.572
  Signal Layer 1 w0.127: v1(136.173,19.149) 138.528,19.149 138.904,18.772 138.904,18.425 v1(140.034,17.295)
NetIC9_20: IC9.20 IC9.22 IC9.39 IC9.41 R157.1 R171.1 | length 27.9
  TopLayer w0.127: IC9.20@140.464,19.572 140.464,20.392 140.542,20.47 141.279,20.47 141.464,20.284 IC9.22@141.464,19.572 141.464,18.811 141.871,18.404 R157.1@141.871,17.737 142.267,18.133 v1(143.26,18.133) ; IC9.41@140.464,26.472 140.464,25.971 140.678,25.757 140.678,25.693 v1(141.422,25.693) 141.482,25.753 141.482,27.721 R171.1@141.38,27.823
  Signal Layer 1 w0.127: v1(141.422,25.693) 140.863,25.134 137.855,25.134 137.468,25.522 136.958,25.522 136.264,24.828 136.264,24.278 138.011,22.531 142.265,22.531 143.26,21.536 v1(143.26,18.133)
NetIC9_26: IC9.26 R88.2 | length 16.2
  TopLayer w0.127: R88.2@134.914,19.488 135.237,19.165 135.237,18.793 136.458,17.572 136.458,17.29 136.939,16.809 138.03,16.809 138.76,16.079 143.111,16.079 144.352,17.32 144.352,20.47 144.05,20.772 IC9.26@143.164,20.772
NetIC9_28: IC9.28 R51.2 TP14.1 | length 48.7
  TopLayer w0.127: v1(132.419,17.088) 136.301,17.088 136.882,16.507 137.631,16.507 139.475,14.663 TP14.1@141.669,14.663 143.619,14.663 144.835,15.879 144.835,21.409 144.472,21.772 IC9.28@143.164,21.772
  BottomLayer w0.127: R51.2@109.214,7.488 110.022,7.488 111.682,9.148 116.604,9.148 120.944,13.488 120.944,13.988 124.044,17.088 v1(132.419,17.088)
NetIC9_33: IC9.33 R101.2 | length 16.2
  TopLayer w0.127: R101.2@133.595,28.75 134.347,28.75 134.954,29.357 136.459,29.357 136.571,29.47 137.244,29.47 137.256,29.483 137.832,29.483 137.957,29.357 143.059,29.357 144.2,28.217 144.2,24.559 143.912,24.272 IC9.33@143.164,24.272
NetIC9_36: IC9.36 R99.2 | length 13.3
  TopLayer w0.127: R99.2@133.595,27.785 133.93,27.785 134.945,28.8 134.945,28.831 135.218,29.103 136.564,29.103 136.677,29.216 137.349,29.216 137.362,29.229 137.726,29.229 137.852,29.103 142.627,29.103 143.164,28.566 IC9.36@143.164,25.772
NetIC12_1: IC12.1 R43.1 R44.2 | length 4.9
  TopLayer w0.254: IC12.1@128.817,38.497 128.804,38.484 128.804,35.343 128.816,35.331 129.08,35.595 130.124,35.595 R44.2@130.333,35.804
NetIC12_3: IC12.3 R37.1 | length 2.3
  TopLayer w0.254: IC12.3@129.817,38.447 129.822,38.442 129.822,37.57 130.142,37.25 R37.1@131.117,37.25
NetIC13_1: IC13.1 R38.1 R40.2 | length 3.7
  BottomLayer w0.254: IC13.1@129.205,41.469 129.192,41.482 129.275,41.482 129.275,41.841 130.103,42.668 130.103,43.274 R40.2@130.316,43.487
  BottomLayer w0.381: R40.2@130.303,43.5 130.316,43.487 131.457,43.487 R38.1@131.469,43.475
NetIC13_3: IC13.3 R41.1 | length 1.7
  BottomLayer w0.254: IC13.3@129.174,40.456 129.187,40.469 IC13.3@129.255,40.469 129.268,40.456 129.782,40.456 129.931,40.307 129.931,39.684 R41.1@129.774,39.527
NetIC27_2: IC27.2 R150.1 R153.2 | length 3.6
  TopLayer w0.2: R153.2@116.109,30.63 115.982,30.757 115.982,32.027 116.495,32.54 IC27.2@117.94,32.54
NetIC35_5: IC35.5 R162.1 R164.2 | length 3
  TopLayer w0.305: R164.2@122.907,61.795 122.907,60.525 123.531,59.9 IC35.5@123.531,59.069
NetIC35_9: IC35.9 L16.1 | length 1.9
  TopLayer w0.33: IC35.9@125.032,56.969 125.032,55.098 L16.1@125.066,55.064
NetLD4_2: LD4.2 R113.2 | length 20.3
  BottomLayer w0.203: LD4.2@-0.878,12.964 0.708,14.551 7.464,14.551 14.207,7.808 R113.2@14.207,5.994
NetLD4_4: LD4.4 R114.2 | length 12.4
  BottomLayer w0.203: LD4.4@1.662,12.964 2.939,12.964 5.838,10.066 5.838,10.05 6.367,9.521 7.68,9.521 R114.2@11.207,5.994
NetLD4_6: LD4.6 R115.2 | length 11.8
  BottomLayer w0.203: LD4.6@4.202,12.964 5.499,12.964 6.378,12.086 7.262,12.086 12.707,6.641 R115.2@12.707,5.994
NetLD4_8: LD4.8 R119.2 | length 24.7
  BottomLayer w0.203: LD4.8@6.742,12.964 5.863,13.843 0.606,13.843 0.025,13.263 0.025,10.052 0.886,9.191 6.347,9.191 7.645,7.893 7.645,4.55 7.407,4.312 R119.2@7.407,2.344
NetLD5_2: LD5.2 R120.2 | length 11
  BottomLayer w0.203: LD5.2@-0.878,7.464 0.399,7.464 3.298,4.566 3.298,4.55 3.827,4.021 4.33,4.021 R120.2@7.407,0.944
NetLD5_4: LD5.4 R121.2 | length 11.6
  TopLayer w0.203: LD5.4@1.662,7.464 2.54,8.343 4.565,8.343 5.08,7.828 5.08,7.664 6.916,5.828 7.116,5.828 7.845,5.099 7.845,4.264 7.407,3.826 R121.2@7.407,1.694
NetLD5_6: LD5.6 R122.2 | length 8.6
  TopLayer w0.203: LD5.6@4.202,7.464 5.678,5.988 5.678,2.878 6.666,1.889 6.666,0.935 R122.2@7.407,0.194
NetLD5_8: LD5.8 R123.2 | length 10.1
  TopLayer w0.203: LD5.8@6.742,7.464 8.226,5.98 8.226,-1.197 8.117,-1.306 R123.2@7.407,-1.306
P3V3: C19.2 C20.2 C21.2 C22.2 C23.2 C24.2 C25.2 C26.2 C69.2 C70.2 C96.2 C148.2 C149.2 IC8.2 IC8.11 IC8.15 IC8.16 IC8.24 IC8.30 IC8.37 IC8.45 IC8.46 IC9.2 IC9.11 IC9.15 IC9.16 IC9.24 IC9.30 IC9.37 IC9.45 IC9.46 IC19.3 IC19.4 IC23.10 IC23.16 IC35.8 IC35.10 L1.1 L2.2 L16.2 R6.2 R18.1 R22.1 R33.2 R42.1 R162.2 TP10.1 | length 364.1
  TopLayer w0.127: IC8.2@136,38.319 137.157,38.319 137.7,38.861 IC8.46@137.7,39.519 137.7,40.31 v1(137.9,40.51)
  TopLayer w0.203: IC23.10@16.657,-0.931 17.485,-0.931 17.878,-1.324 18.64,-1.324 19.402,-0.562 ; IC23.16@16.657,2.969 18.5,2.969 C96.2@18.602,2.867 18.602,2.778 19.402,1.978 19.402,-0.562 ; 112.497,-1.859 90.36,-1.859 90.106,-2.113 40.666,-2.113 39.876,-1.324 20.164,-1.324 19.402,-0.562 ; C149.2@121.129,57.35 120.367,58.112 120.367,59.636 121.232,60.501 R162.2@121.232,60.519 ; C149.2@121.764,57.096 121.815,57.045 v1@121.815,56.207 ; IC35.10@125.574,56.969 v1(126.336,56.969) 126.931,56.969 C148.2@127.032,57.069 ; v1(137.9,40.51) 138.2,40.211 IC8.45@138.2,39.519
  TopLayer w0.254: 124.822,48.538 R33.2@125.844,49.56 ; R22.1@133.849,23.01 133.849,21.294 134.172,20.972 134.172,20.709 134.32,20.56 134.583,20.56 134.775,20.368 v1(135.386,20.368) 135.79,20.772 IC9.11@136.264,20.772 ; IC8.11@136,33.819 136.054,33.764 136.925,33.764 137.7,32.99 IC8.15@137.7,32.619 137.7,32.075 v1(138.027,31.747) 138.2,31.92 IC8.16@138.2,32.619 ; IC9.2@136.264,25.272 136.344,25.352 137.246,25.352 137.964,26.07 IC9.46@137.964,26.472 137.964,27.276 138.168,27.48 v1(138.434,27.48) 138.434,26.502 IC9.45@138.464,26.472 ; IC9.15@137.964,19.572 137.964,18.84 138.044,18.76 138.09,18.76 138.239,18.611 138.239,18.59 v1(138.463,18.59) C24.2@139.01,18.043 ; v1(138.463,18.59) IC9.16@138.464,19.572 ; R18.1@139.78,30.439 139.986,30.233 141.441,30.233 142.2,30.992 v1@142.2,31.798 ; v1(141.685,40.51) 141.939,40.51 142.2,40.249 IC8.37@142.2,39.519 ; v1(142.168,31.798) v1@142.2,31.798 ; IC8.24@142.2,32.619 v1@142.2,31.798 ; v1(142.464,18.827) IC9.24@142.464,19.572 ; IC9.37@142.464,26.472 142.464,27.345 v1(142.472,27.353) ; 142.605,47.488 142.894,47.199 IC19.3@142.894,44.399 ; IC8.30@142.9,35.819 v1@143.699,35.819 ; IC9.30@143.164,22.772 144.013,22.772 v1(144.022,22.781)
  TopLayer w0.381: 123.369,56.238 123.879,56.238 123.942,56.302 124.531,56.302 IC35.8@124.531,56.969 ; R42.1@127.138,46.571 127.138,47.48 127.146,47.488
  TopLayer w0.508: L16.2@121.815,54.988 123.065,56.238 123.369,56.238
  TopLayer w0.762: 112.497,-1.88 113.551,-1.88 117.211,1.78 117.637,1.78 118.227,2.371 118.227,2.796 120.819,5.388 136.416,5.388 138.202,7.174 138.202,7.519 140.298,9.615 145.947,9.615 146.767,10.435 146.767,44.913 144.192,47.488 142.605,47.488 138.544,47.488 ; v3(120.744,51.588) 121.744,51.588 124.794,48.538 ; C149.2@121.554,57.096 121.764,57.096 v1(121.764,56.207) 121.764,54.226 L16.2@121.815,54.175 ; L16.2@121.815,53.845 121.51,53.54 122.272,52.778 122.272,51.762 ; L1.1@122.16,25.721 122.779,26.34 122.779,26.799 124.335,28.354 124.335,28.687 v3(124.38,28.732) ; 124.822,48.538 124.794,48.538 ; v3(131.152,48.444) v3@131.161,48.436 ; v1(133.844,16.088) 134.019,15.913 TP10.1@134.019,14.338 ; L2.2@134.909,49.482 134.815,49.576 131.284,49.576 C25.2@131.161,49.7 v3@131.161,48.436 ; v3(138.569,45.369) 138.544,45.394 138.544,47.488 ; 124.794,48.538 125.844,47.488 127.146,47.488 131.161,47.488 ; 131.161,47.488 138.544,47.488 ; 131.161,47.488 v3@131.161,48.436
  Signal Layer 1 w0.762: v3@120.744,51.524 120.744,46.338 122.544,44.538 122.544,42.116 122.927,41.733 122.927,37.592 123.382,37.137 123.382,32.574 124.38,31.577 v3(124.38,28.732)
  BottomLayer w0.203: v1(121.764,56.207) 122.526,56.969 v1(126.336,56.969)
  BottomLayer w0.254: v1(135.386,20.368) 135.437,20.419 C69.2@136.968,20.419 136.968,20.086 v1(138.463,18.59) 142.227,18.59 v1(142.464,18.827) 143.522,18.827 144.022,19.327 v1(144.022,22.781) 144.022,27.014 143.683,27.353 ; v1(137.9,40.51) 138.561,40.51 ; C70.2@138.027,26.355 138.027,27.074 v1(138.434,27.48) 138.963,26.951 140.802,26.951 141.204,27.353 v1(142.472,27.353) 143.683,27.353 ; v1(138.027,31.747) 137.9,31.874 C22.2@137.9,32.821 138.924,31.798 139.982,31.798 140.46,32.277 140.878,32.277 141.356,31.798 v1(142.168,31.798) ; v3(138.569,45.369) 138.561,45.361 138.561,40.51 ; C20.2@141.71,33.253 142.168,32.796 v1(142.168,31.798) ; C19.2@142.567,35.811 143.692,35.811 v1(143.717,35.837) ; 138.561,40.51 v1(141.685,40.51) 143.308,40.51 143.717,40.101 v1(143.717,35.837) ; v1(142.168,31.798) 143.479,31.798 143.6,31.919 ; 143.6,31.919 143.717,32.036 v1(143.717,35.837) ; 143.6,31.919 143.6,27.436 143.683,27.353
  BottomLayer w0.508: v1(137.9,40.51) 138.002,40.409 C23.2@138.002,39.284 ; v1(141.685,40.51) 141.71,40.485 C21.2@141.71,39.614
  BottomLayer w0.762: v3(131.152,48.444) 131.156,48.448 131.156,49.696 C26.2@131.161,49.7
P3V3_MP: C38.2 D3.4 IC10.8 IC32.4 J37.30 TP13.1 | length 42.7
  TopLayer w0.508: TP13.1@136.301,10.488 137.501,11.688 v1(144.373,11.688) ; v1(142.997,7.688) 142.997,3.978 144.006,2.968 147.024,2.968 148.177,4.121 ; D3.4@148.177,5.079 148.177,4.121 ; J37.30@152.101,14.729 153.444,13.386 153.444,5.425 152.14,4.121 148.177,4.121
  BottomLayer w0.508: IC10.8@140.706,10.258 C38.2@144.091,10.258 ; v1(142.997,7.688) 142.997,7.964 IC32.4@143.691,8.658 ; IC32.4@143.678,8.895 143.678,9.145 143.724,9.191 143.818,9.191 144.116,9.488 C38.2@144.116,10.292 ; C38.2@144.165,10.348 144.165,10.704 144.373,10.912 v1(144.373,11.688)
P3V3_PSEQ: C30.2 C35.2 IC12.4 IC13.4 IC14.1 R35.1 R36.1 R37.2 R39.1 R41.2 R42.2 | length 28.6
  TopLayer w0.254: IC12.4@129.817,39.597 129.81,39.604 129.83,39.624 129.83,40.006 129.979,40.154 130.414,40.154 ; C30.2@131.104,40.042 C30.2@131.101,40.045 ; R37.2@131.19,38.263 R37.2@131.117,38.19 131.104,38.177 131.098,38.183 130.559,38.183 v1(130.553,38.177) 130.553,38.243 130.397,38.4 130.397,40.137 130.414,40.154 ; C30.2@131.206,40.015 131.138,40.083 C30.2@131.101,40.045 ; 130.414,40.154 130.992,40.154 C30.2@131.101,40.045
  TopLayer w0.381: R36.1@128.078,45.676 R42.2@128.078,46.571 128.088,46.581 128.73,46.581 129.063,46.248 129.849,46.248 IC14.1@129.856,46.256 129.943,46.169 129.943,45.707 131.937,43.714 ; C30.2@131.101,40.045 131.101,41.014 R35.1@131.361,41.273 131.415,41.218 132.125,41.218 132.375,41.469 132.375,43.275 131.937,43.714 ; 131.948,43.714 131.937,43.714
  BottomLayer w0.254: R39.1@127.537,31.606 127.537,32.322 128.713,33.498 128.713,37.189 ; C35.2@127.889,39.518 127.893,39.522 127.976,39.605 127.976,40.456 127.989,40.469 IC13.4@128.105,40.469 128.215,40.469 IC13.4@128.228,40.456 ; C35.2@127.893,39.573 R41.2@128.829,39.573 ; R41.2@128.713,39.522 128.713,37.189 ; R41.2@128.829,39.522 R41.2@128.834,39.527 ; v1(130.553,38.177) 129.565,37.189 128.713,37.189
P12V0: C10.1 C129.2 J2.10 J37.28 J37.29 L8.2 R30.1 | length 256
  TopLayer w1: R30.1@34.906,89.469 36.925,89.469 v5(36.935,89.479) v5@36.944,89.488 ; L8.2@119.184,67.838 119.934,67.838 121.069,68.973 121.069,68.997 121.655,69.583 122.307,69.583 C129.2@122.332,69.608 122.357,69.583 123.446,69.583 124.032,68.997 124.032,67.306 126.318,65.019 130.047,65.019 130.255,65.227 v3(130.255,64.996) ; J37.29@149.668,14.878 J37.28@152.188,17.397
  Signal Layer 1 w1: v5@36.944,89.488 38.218,90.762 111.67,90.762 114.188,88.244 114.188,52.961 115.934,51.216 118.215,51.216 119.844,52.845 119.844,55.801 125.694,61.651 125.694,63.746 126.944,64.996 v3(130.255,64.996)
  BottomLayer w1: C10.1@130.319,68.537 130.255,68.474 v3(130.255,64.996) 130.647,65.388 v3(131.244,65.388) 133.92,65.388 137.52,68.988 153.008,68.988 154.715,67.281 154.715,6.677 154.068,6.03 151.156,6.03 150.477,5.351 150.477,5.279
  other v3: 130.244,66.088